# Altium PCB Layout.PcbDoc
Units mm, origin at the board's own origin, x right, y up, seen from the top; angles counter-clockwise.
Board outline 60 x 50 mm, 4 copper layers (Top Layer, Ground Layer, Power Layer, Bottom Layer), stack 1.591 mm thick; 80 components, 60 nets, 288 pads, 83 vias.
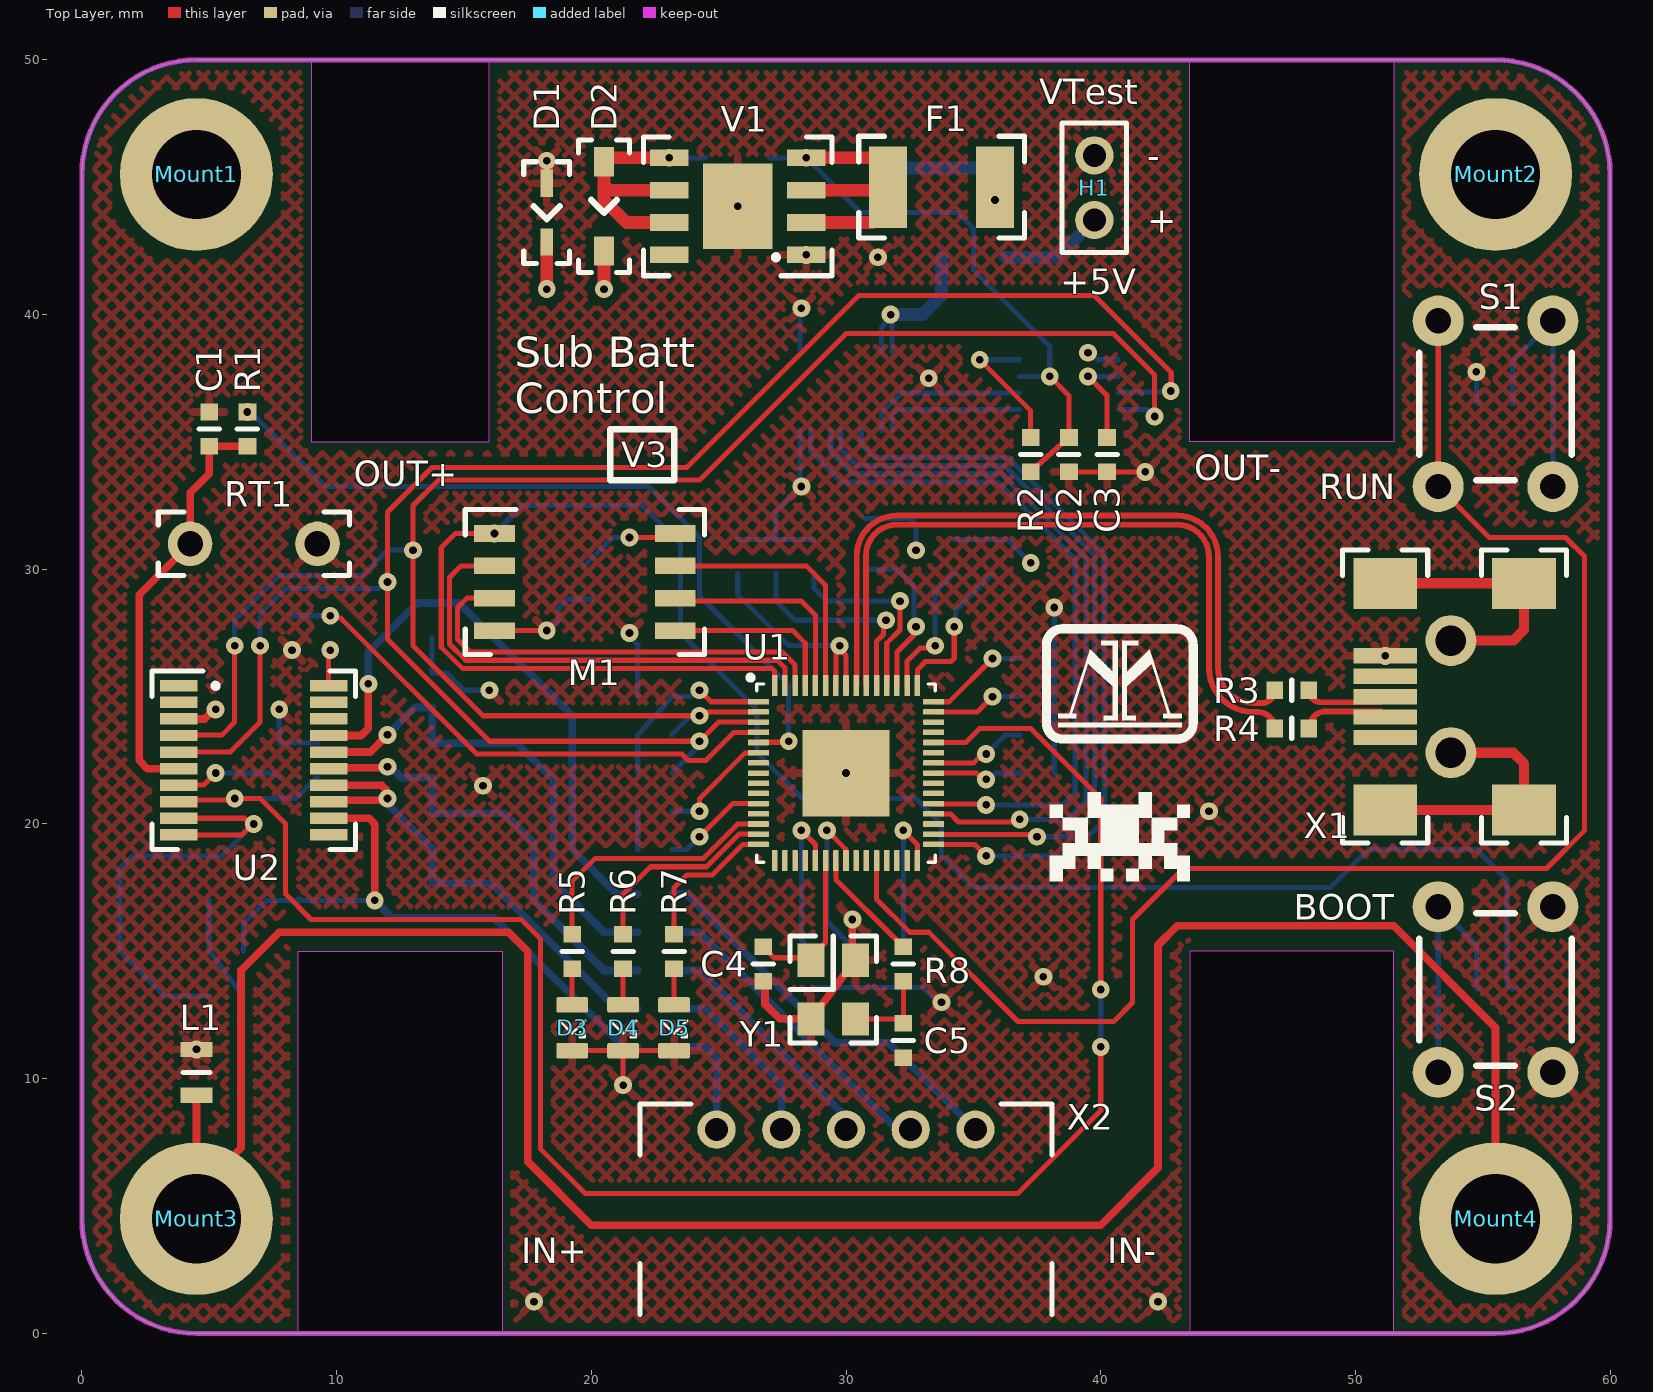
[diagram p0: Top Layer view]
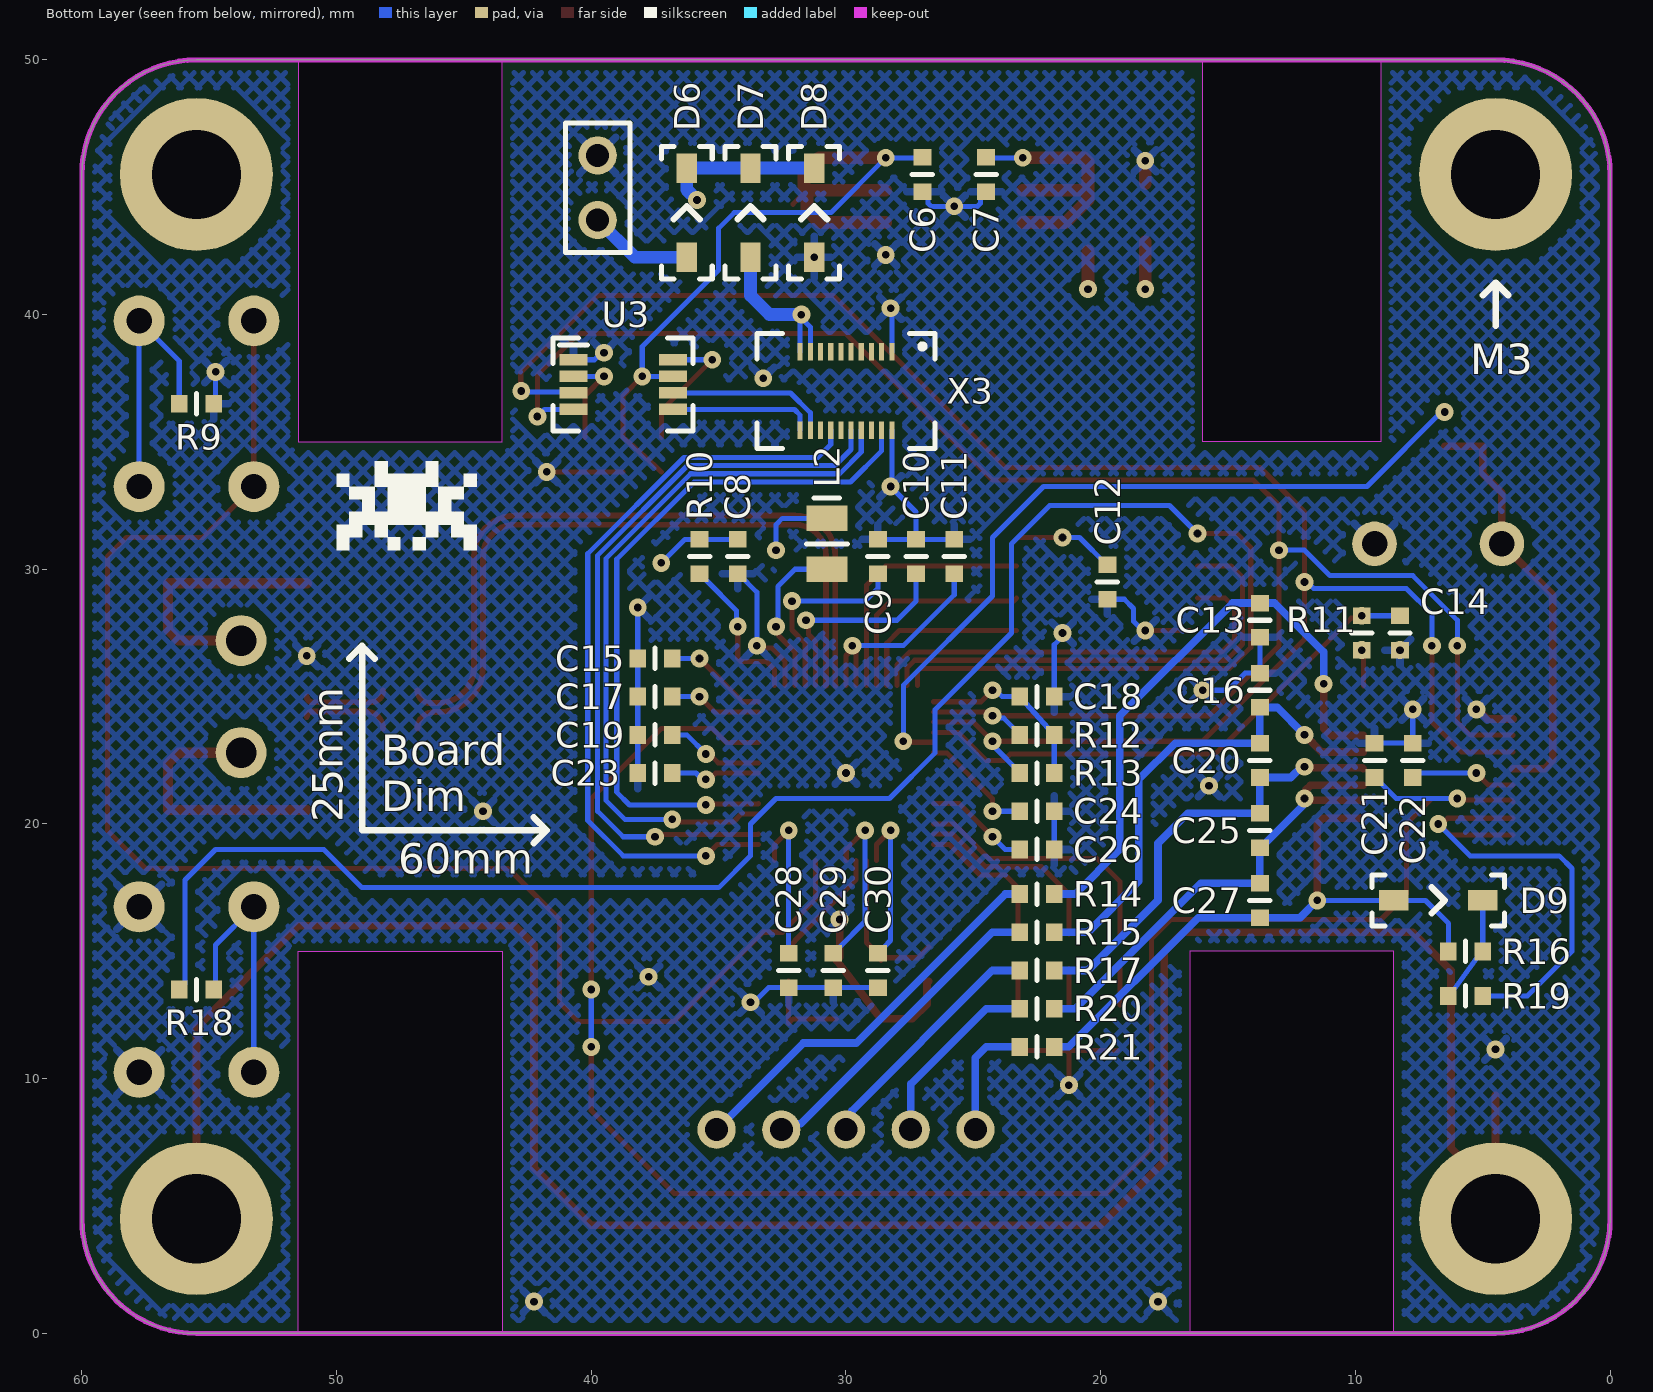
[diagram p1: Bottom Layer view, seen from below]
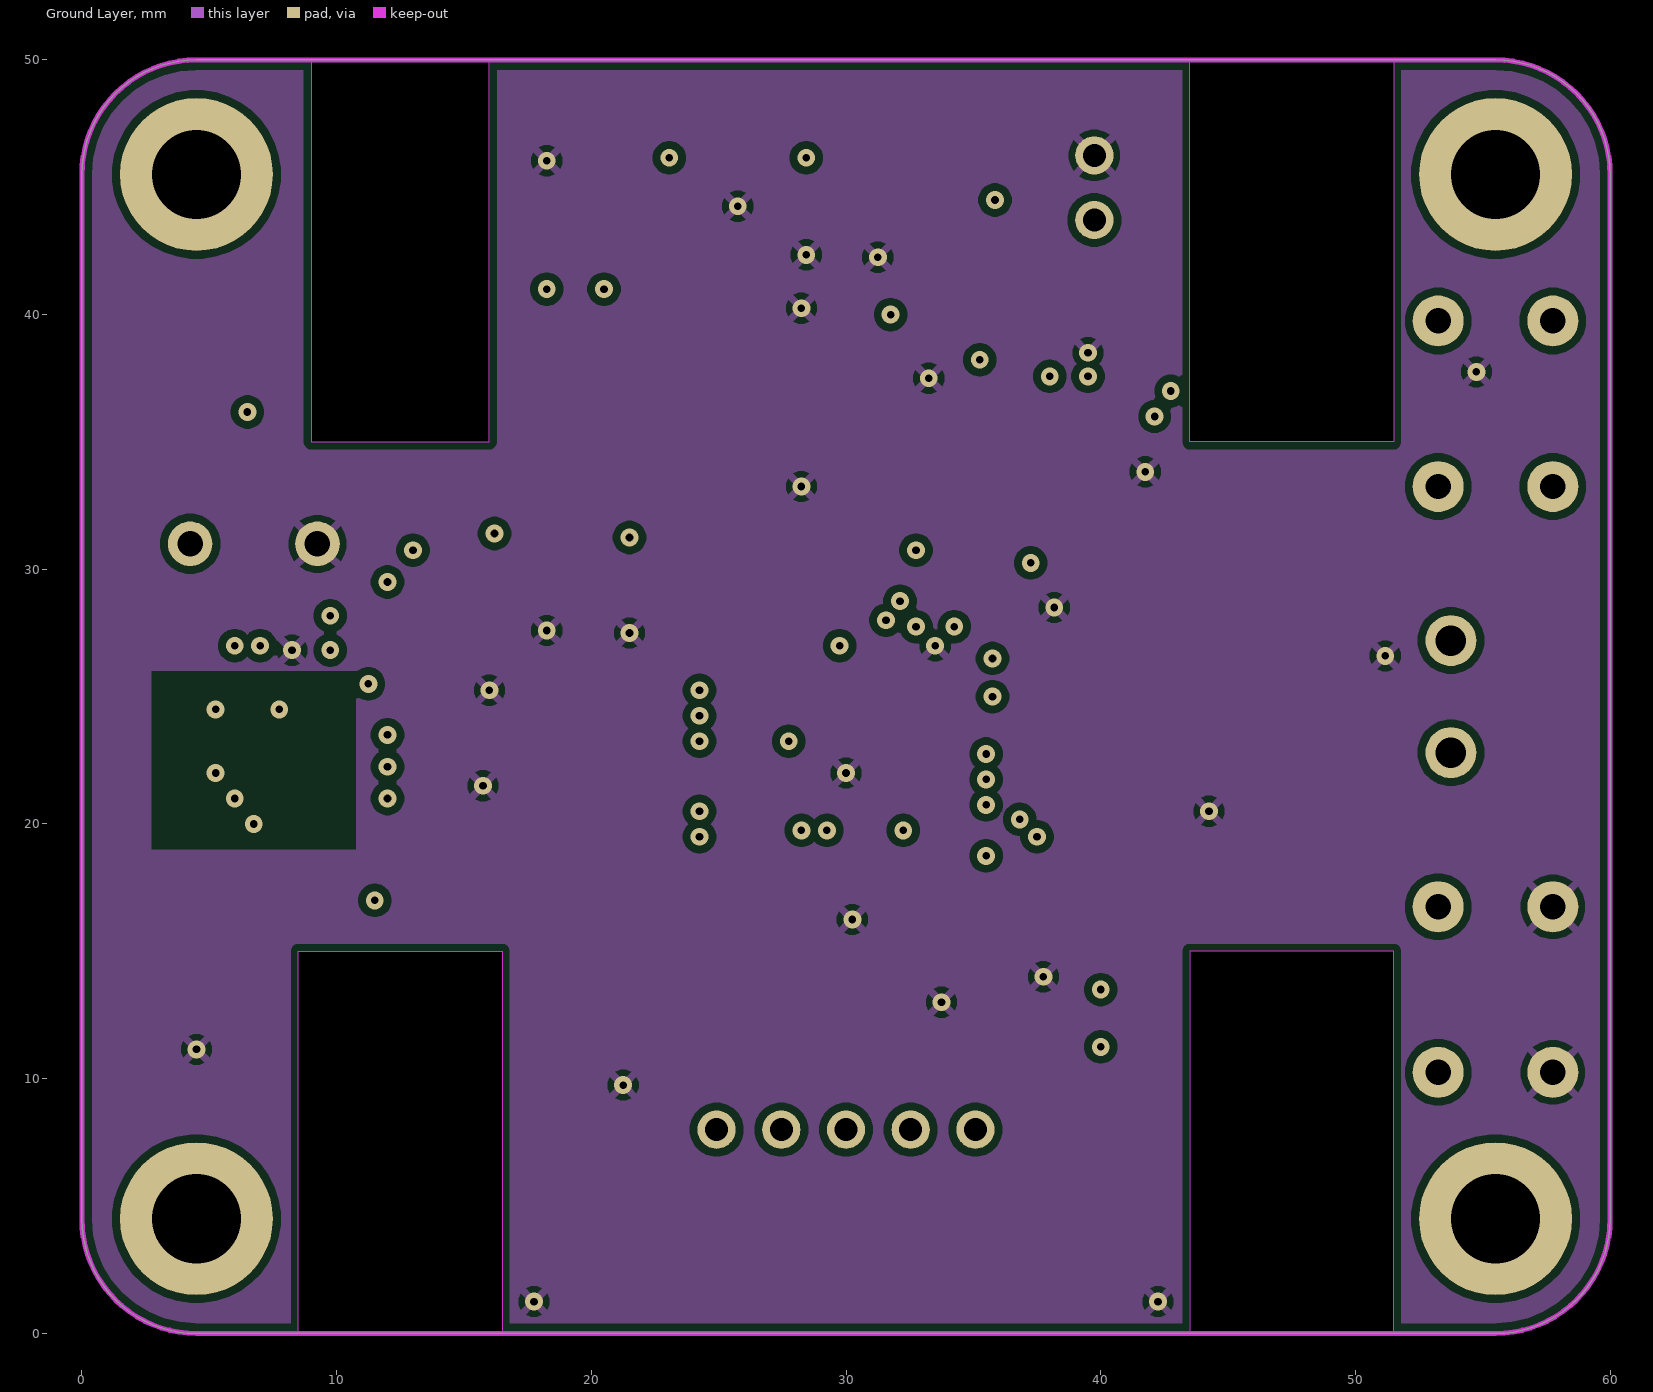
[diagram p2: Ground Layer]
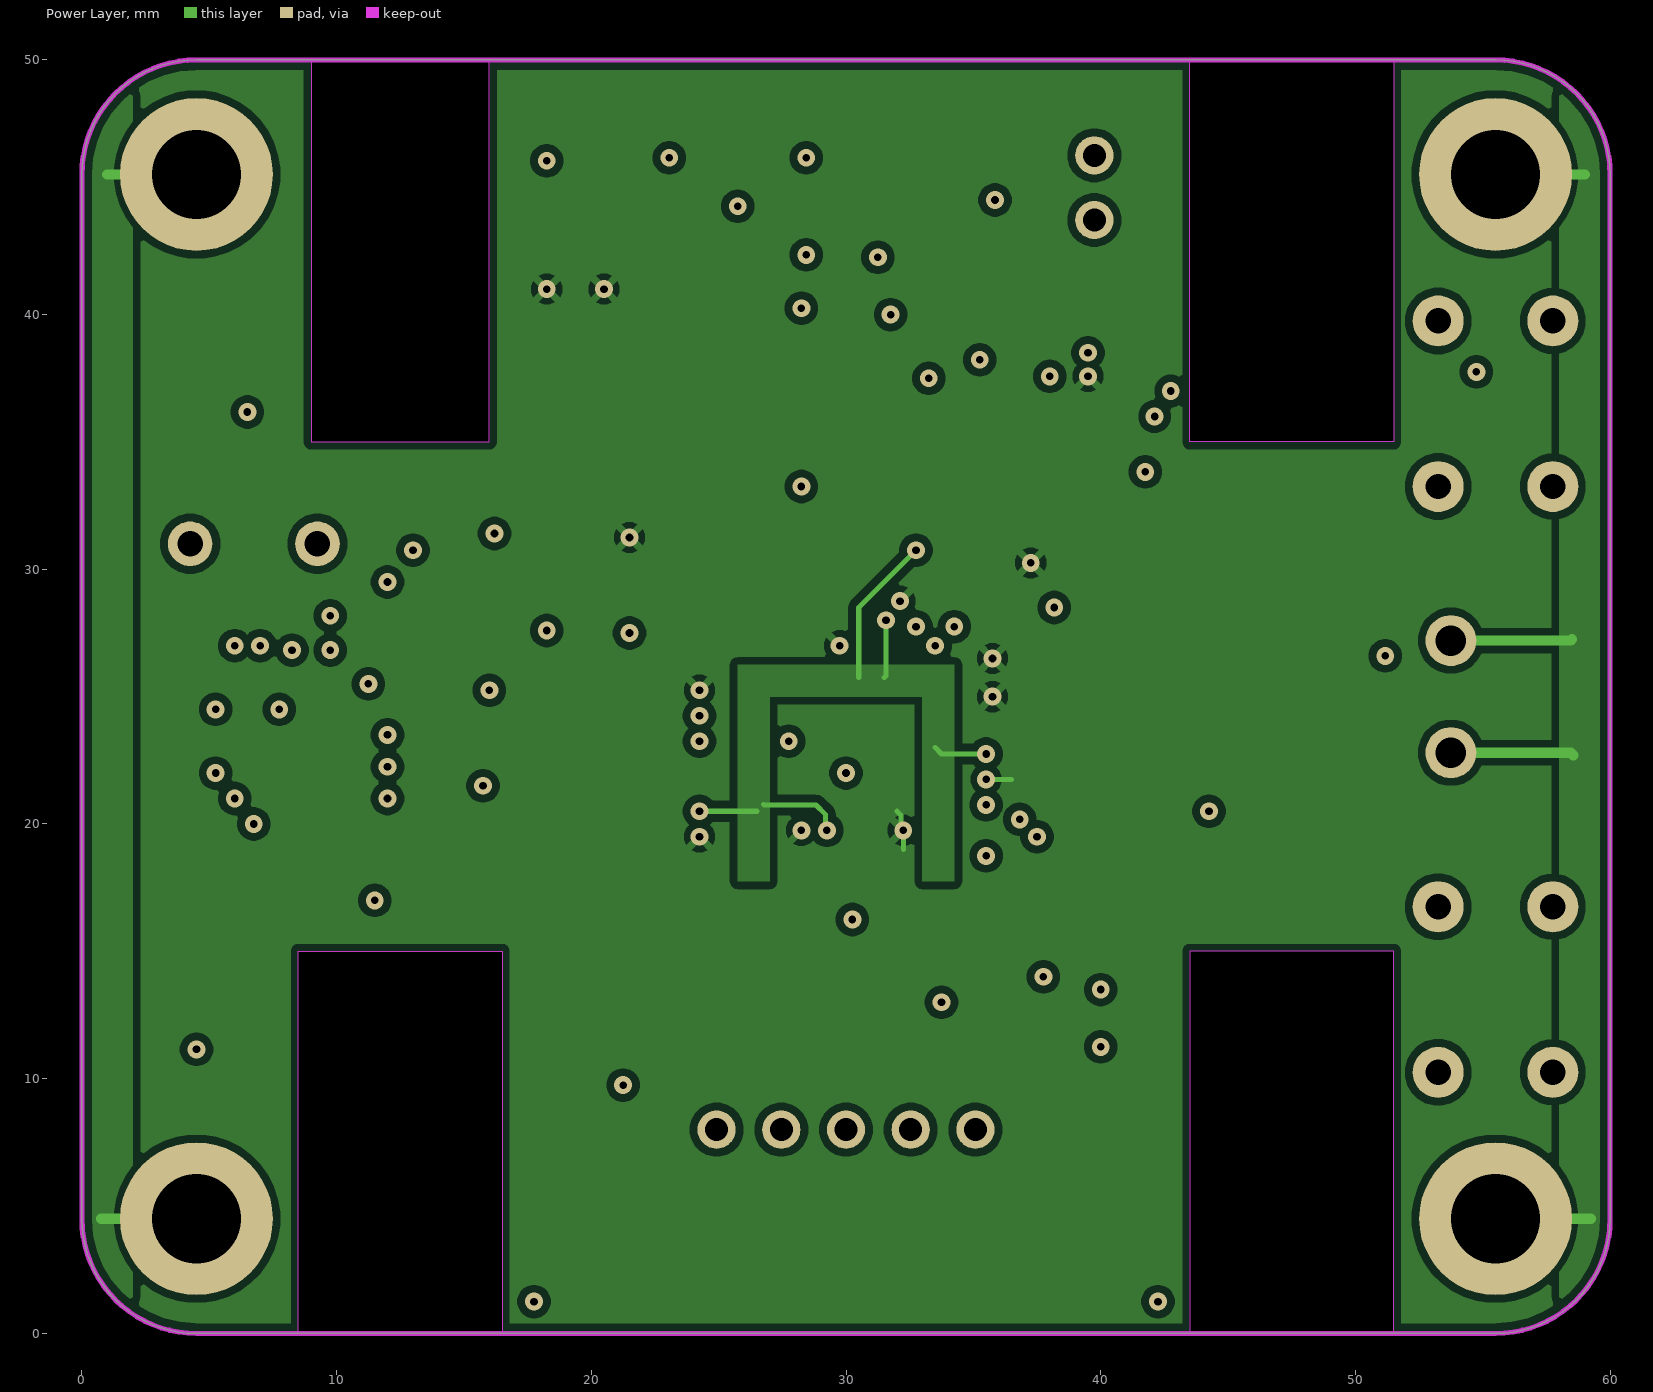
[diagram p3: Power Layer]

## Layer stack, top to bottom
Top Solder: solder mask 0.0102, Solder Resist, Dk 3.8
Top Layer: signal copper 0.035
Dielectric 2: prepreg 0.2104, 7628*1, Dk 4.4
Ground Layer: signal copper 0.0175
Dielectric 1: dielectric 1.065, FR-4, Dk 4.8
Power Layer: signal copper 0.0175
Dielectric 3: prepreg 0.2104, 7628*1, Dk 4.4
Bottom Layer: signal copper 0.035
Bottom Solder: solder mask 0.0102, Solder Resist, Dk 3.8

## Board outline
0,4.5 0,45.5 cw(c4.5,45.5) 4.5,50 55.5,50 cw(c55.5,45.5) 60,45.5 60,4.5 cw(c55.5,4.5) 55.5,0 4.5,0 cw(c4.5,4.5)
cut-out: 8.5,0 8.5,15 16.5,15 16.5,0
cut-out: 51.5,50 51.5,35 43.5,35 43.5,50
cut-out: 9,50 9,35 16,35 16,50
cut-out: 51.5,0 51.5,15 43.5,15 43.5,0

## Design rules (kind name [scope] priority, off if disabled: settings)
BoardOutlineClearance [All] p1: gap=0.2 ignorepadtopadclearanceinfootprint=FALSE
Clearance "inPolygon Clearance" [InPolygon] p1: gap=0.3 ignorepadtopadclearanceinfootprint=TRUE // this rule ensures that every net within a polygon of a different net has a set clearance from the poly
Clearance "Different Diff Pair" [All] p2: gap=0.2 ignorepadtopadclearanceinfootprint=TRUE
Clearance "Same Diff Pair" [All] p3: gap=0.1 ignorepadtopadclearanceinfootprint=TRUE
Clearance "Different Nets" [not InAnyDifferentialPair] p4: gap=0.3 ignorepadtopadclearanceinfootprint=TRUE except(0.1: Arc-SMDPad Arc-THPad Arc-Via Arc-Text Track-SMDPad Track-THPad Track-Via Track-Text SMDPad-Text THPad-Text Via-Text Fill-Text Poly-Text Region-Text Text-Text; 0.12: Arc-Arc Arc-Track Track-Track; 0.15: SMDPad-SMDPad SMDPad-THPad SMDPad-Via THPad-THPad THPad-Via Via-Via; 0.2: Arc-Hole Track-Hole SMDPad-Hole THPad-Hole Via-Hole Fill-Hole Poly-Hole Region-Hole Text-Hole)
Clearance "Same Net" [not InAnyDifferentialPair] p5: gap=0 ignorepadtopadclearanceinfootprint=TRUE except(0.1: THPad-Via; 0.18: Arc-Arc Arc-Track Track-Track)
ComponentClearance [All] p1: gap=0.102 collisioncheckmode=3 verticalgap=0.102 showdistances=TRUE
DiffPairsRouting "Ethernet Routing" [InDifferentialPairClass('Ethernet_Pairs')] p1: maxlimit=0.25 minlimit=0.2 mostfreqgap=0.25 toplayer_maxgap=0.2 toplayer_prefgap=0.2 toplayer_minwidth=0.25 toplayer_maxwidth=0.25 toplayer_prefwidth=0.25 midlayer1_mingap=0.25 midlayer1_minwidth=0.19 midlayer1_maxwidth=0.19 midlayer1_prefwidth=0.19 midlayer2_mingap=0.25 midlayer2_minwidth=0.19 midlayer2_maxwidth=0.19 midlayer2_prefwidth=0.19 bottomlayer_maxgap=0.2 bottomlayer_prefgap=0.2 bottomlayer_minwidth=0.25 bottomlayer_maxwidth=0.25 bottomlayer_prefwidth=0.25 impedanceprofiledriven=TRUE maxuncoupledlength=12.7
DiffPairsRouting "USB Routing" [InDifferentialPairClass('USB_Pairs')] p2: maxlimit=0.291 minlimit=0.127 mostfreqgap=0.291 toplayer_maxgap=0.127 toplayer_prefgap=0.127 toplayer_minwidth=0.23 toplayer_maxwidth=0.23 toplayer_prefwidth=0.23 midlayer1_mingap=0.291 midlayer1_minwidth=0.25 midlayer1_maxwidth=0.25 midlayer1_prefwidth=0.25 midlayer2_mingap=0.291 midlayer2_minwidth=0.25 midlayer2_maxwidth=0.25 midlayer2_prefwidth=0.25 bottomlayer_maxgap=0.127 bottomlayer_prefgap=0.127 bottomlayer_minwidth=0.23 bottomlayer_maxwidth=0.23 bottomlayer_prefwidth=0.23 impedanceprofiledriven=TRUE impedanceprofileid={C9F4D3A4-5B07-450B-A906-2288EA58A68B} impedanceprofilevalue=90.000000 maxuncoupledlength=12.7
DiffPairsRouting "CAN Routing" [InDifferentialPairClass('CAN_Pairs')] p3: maxlimit=0.907 minlimit=0.5 mostfreqgap=0.907 toplayer_maxgap=0.5 toplayer_prefgap=0.5 toplayer_minwidth=0.201 toplayer_maxwidth=0.201 toplayer_prefwidth=0.201 midlayer1_mingap=0.907 midlayer1_minwidth=0.155 midlayer1_maxwidth=0.155 midlayer1_prefwidth=0.155 midlayer2_mingap=0.907 midlayer2_minwidth=0.155 midlayer2_maxwidth=0.155 midlayer2_prefwidth=0.155 bottomlayer_maxgap=0.5 bottomlayer_prefgap=0.5 bottomlayer_minwidth=0.201 bottomlayer_maxwidth=0.201 bottomlayer_prefwidth=0.201 impedanceprofiledriven=TRUE maxuncoupledlength=12.7
Height [All] p1: minheight=0 maxheight=1816.048 prefheight=12.7
HoleSize [All] p1: absolutevalues=TRUE maxlimit=6.3 minlimit=0.3 maxpercent=80.000 minpercent=20.000
HoleToHoleClearance [All] p1: gap=0.25 allowstackedmicrovias=FALSE
MatchedLengths "XTAL Nets Matched Delays" [InNetClass('XTAL_Nets')] p1: tolerance=25.4 checknetsindiffpair=FALSE checkdiffpairvsdiffpair=TRUE checkxsignals=TRUE checkothers=TRUE usedelayunits=TRUE delaytolerance=10.000000
MatchedLengths "Diff Pair Matched Delays" [InDifferentialPairClass('Ethernet_Pairs') or InDifferentialPairClass('USB_Pairs') or InDifferentialPairClass('CAN_Pairs')] p2: tolerance=5 checknetsindiffpair=TRUE checkdiffpairvsdiffpair=FALSE checkxsignals=FALSE checkothers=FALSE usedelayunits=TRUE delaytolerance=100.000000 phasematching=TRUE phasedelaytolerance=5.000000 phasedistance=12.7
MinimumAnnularRing [All] p1: minimumring=0.2
MinimumSolderMaskSliver [All] p1: minsoldermaskwidth=0
PlaneClearance "Supply Net Clearance" [InNetClass('Supply_Nets')] p1: clearance=0.5
PlaneClearance "All Nets" [All] p2: clearance=0.3
PlaneConnect [All] p1: planeconnectstyle=Relief reliefexpansion=0.5 reliefentries=4 reliefconductorwidth=0.2 reliefairgap=0.2
PolygonConnect "Supply Nets" [InNetClass('Supply_Nets')] p1: connectstyle=Relief reliefconductorwidth=0.3 reliefentries=4 polygonreliefangle="90 Angle" conductorbypadedge=TRUE mindistance=0.381 enablemindistance=FALSE airgapwidth=0.254
PolygonConnect General [All] p2: connectstyle=Relief reliefconductorwidth=0.254 reliefentries=4 polygonreliefangle="90 Angle" airgapwidth=0.254
RoutingVias [All] p1: holewidth=0.2 width=0.35 viastyle="Through Hole" minholewidth=0.15 minwidth=0.3 maxholewidth=6.3 maxwidth=6.55
SilkToSilkClearance [All] p1: silktosilkclearance=0
SilkToSolderMaskClearance [All] p1: minsilkscreentomaskgap=0 clearancetoexposedcopper=TRUE
SolderMaskExpansion [All] p1: expansion=0.075 istentingtop=FALSE
SupplyNets "Schematic Supply Nets_7" [InNet('+1V1')] p1: voltage=0.000
SupplyNets "Schematic Supply Nets_6" [InNet('+3V3')] p2: voltage=0.000
SupplyNets "Schematic Supply Nets_5" [InNet('XOUT')] p3: voltage=0.000
SupplyNets "Schematic Supply Nets_4" [InNet('+5V')] p4: voltage=0.000
SupplyNets "Schematic Supply Nets_2" [InNet('XIN')] p5: voltage=0.000
SupplyNets "Schematic Supply Nets" [InNet('RUN')] p6: voltage=0.000
SupplyNets "Schematic Supply Nets_3" [InNet('GND')] p7: voltage=0.000
SupplyNets "Schematic Supply Nets_1" [InNet('Earth')] p8: voltage=0.000
UnRoutedNet [All] p1: checkbadconnections=TRUE
Width "nRF Width" [InNetClass('nRF Signal')] p1: maxlimit=0.379 minlimit=0.263 preferedwidth=0.379 toplayer_minwidth=0.379 midlayer1_maxwidth=0.263 midlayer1_prefwidth=0.263 midlayer2_maxwidth=0.263 midlayer2_prefwidth=0.263 bottomlayer_minwidth=0.379 impedanceprofiledriven=TRUE minimp=50.000000 maximp=50.000000 favimp=50.000000 checkconnectedcopper=TRUE
Width [All] p2: maxlimit=100 minlimit=0.1 preferedwidth=0.2
19 further rules are at their usual default settings.

## Classes and differential pairs
net class XTAL_Nets: XIN XOUT
component class "Battery Monitor": C1 C13 C14 C16 C20 C21 C22 C25 C27 D9 R1 R11 R14 R15 R16 R17 R19 R20 R21 RT1 U2
differential pair class USB_Pairs: RP2350_D RP2350_DX
net class Supply_Nets: +3V3 +5V +5V_Test_Src +5V_VIN Earth GND NetC7_2 NetD6_1
component class RP2350: C2 C3 C4 C5 C8 C9 C10 C11 C12 C15 C17 C18 C19 C23 C24 C26 C28 C29 C30 D3 D4 D5 L2 M1 R2 R3 R4 R5 R6 R7 R8 R9 R10 R12 R13 R18 S1 S2 U1 U3 X1 Y1
component class Power: C6 C7 D1 D2 D6 D7 D8 F1 H1 q V1
component class Connections: L1 Mount1 Mount2 Mount3 Mount4 X2 X3
differential pair RP2350_DX: +RP2350_DX_P -RP2350_DX_N
differential pair RP2350_D: +RP2350_D_P -RP2350_D_N

## Components (designator, comment, footprint, x,y, rotation, side; value= is the part's Value field where it differs from the comment)
C1 "[Cap] 0603 4700pF 5% 50V" "[Cap] SMD 0603" 5,35.5 r270 top (schematic designator C24)
C2 "[Cap] 0603 0.1uF 10% 50V" "[Cap] SMD 0603" 38.75,34.5 r90 top (schematic designator C1)
C3 "[Cap] 0603 0.1uF 10% 50V" "[Cap] SMD 0603" 40.25,34.5 r90 top (schematic designator C2)
C4 "[Cap] 0603 15pF 1% 100V" "[Cap] SMD 0603" 26.75,14.5 r90 top (schematic designator C8)
C5 "[Cap] 0603 15pF 1% 100V" "[Cap] SMD 0603" 32.25,11.5 r90 top (schematic designator C10)
C6 "[Cap] 0603 10uF 10% 10V" "[Cap] SMD 0603" 27,45.5 r90 bottom (schematic designator C11)
C7 "[Cap] 0603 10uF 10% 10V" "[Cap] SMD 0603" 24.5,45.5 r90 bottom (schematic designator C12)
C8 "[Cap] 0603 4.7uF 10% 25V" "[Cap] SMD 0603" 34.25,30.5 r90 bottom (schematic designator C13)
C9 "[Cap] 0603 4.7uF 10% 25V" "[Cap] SMD 0603" 28.75,30.5 r90 bottom (schematic designator C14)
C10 "[Cap] 0603 4.7uF 10% 25V" "[Cap] SMD 0603" 27.25,30.5 r90 bottom (schematic designator C15)
C11 "[Cap] 0603 0.1uF 10% 50V" "[Cap] SMD 0603" 25.75,30.5 r270 bottom (schematic designator C16)
C12 "[Cap] 0603 0.1uF 10% 50V" "[Cap] SMD 0603" 19.738,29.5 r90 bottom (schematic designator C17)
C13 "[Cap] 0603 1uF 10% 25V" "[Cap] SMD 0603" 13.75,28 r270 bottom (schematic designator C27)
C14 "[Cap] 0603 470pF 5% 50V" "[Cap] SMD 0603" 8.25,27.5 r90 bottom (schematic designator C6)
C15 "[Cap] 0603 0.1uF 10% 50V" "[Cap] SMD 0603" 37.5,26.5 r180 bottom (schematic designator C18)
C16 "[Cap] 0603 1uF 10% 25V" "[Cap] SMD 0603" 13.75,25.25 r270 bottom (schematic designator C26)
C17 "[Cap] 0603 0.1uF 10% 50V" "[Cap] SMD 0603" 37.5,25 r180 bottom (schematic designator C19)
C18 "[Cap] 0603 0.1uF 10% 50V" "[Cap] SMD 0603" 22.5,25 r0 bottom (schematic designator C20)
C19 "[Cap] 0603 4.7uF 10% 25V" "[Cap] SMD 0603" 37.5,23.5 r180 bottom (schematic designator C21)
C20 "[Cap] 0603 1uF 10% 25V" "[Cap] SMD 0603" 13.75,22.5 r270 bottom (schematic designator C9)
C21 "[Cap] 0603 4.7uF 10% 25V" "[Cap] SMD 0603" 9.25,22.5 r270 bottom (schematic designator C4)
C22 "[Cap] 0603 1uF 10% 50V" "[Cap] SMD 0603" 7.75,22.5 r270 bottom (schematic designator C5)
C23 "[Cap] 0603 0.1uF 10% 50V" "[Cap] SMD 0603" 37.5,22 r180 bottom (schematic designator C22)
C24 "[Cap] 0603 0.1uF 10% 50V" "[Cap] SMD 0603" 22.5,20.5 r0 bottom (schematic designator C23)
C25 "[Cap] 0603 1uF 10% 25V" "[Cap] SMD 0603" 13.75,19.75 r270 bottom (schematic designator C7)
C26 "[Cap] 0603 0.1uF 10% 50V" "[Cap] SMD 0603" 22.5,19 r0 bottom (schematic designator C25)
C27 "[Cap] 0603 1uF 10% 25V" "[Cap] SMD 0603" 13.75,17 r270 bottom (schematic designator C3)
C28 "[Cap] 0603 0.1uF 10% 50V" "[Cap] SMD 0603" 32.25,14.25 r90 bottom
C29 "[Cap] 0603 0.1uF 10% 50V" "[Cap] SMD 0603" 30.5,14.25 r90 bottom
C30 "[Cap] 0603 0.1uF 10% 50V" "[Cap] SMD 0603" 28.75,14.25 r90 bottom
D1 "SOD-323" "[Diode] SOD-323" 18.25,44 r270 top
D2 "SOD123" "[Diode] SMD SOD-123" 20.5,44.25 r270 top
D3 "[LED] SMD 0805 Green" "[LED] SMD 0805" 19.25,12 r270 top (schematic designator D5)
D4 "[LED] SMD 0805 Yellow" "[LED] SMD 0805" 21.25,12 r270 top (schematic designator D3)
D5 "[LED] SMD 0805 Red" "[LED] SMD 0805" 23.25,12 r270 top (schematic designator D4)
D6 "SOD123" "[Diode] SMD SOD-123" 36.25,44 r90 bottom
D7 "SOD123" "[Diode] SMD SOD-123" 33.75,44 r90 bottom
D8 "SOD-123" "[Diode] SMD SOD-123" 31.25,44 r90 bottom
D9 "SOD123" "[Diode] SMD SOD-123" 6.75,17 r180 bottom
F1 "[PTC] SMD 1812 500mA" "[PTC] SMD 1812" 33.75,45 r180 top
H1 "1x2 Header" "[Header] 1x2 Male" 39.75,44.98 r90 top
L1 "652-MH2029-300Y" "[Ferrite] SMD 0805" 4.5,10.25 r90 top
L2 "[3.3uH] SMD 0806 2.1A" "[Inductor] SMD 0806" 30.75,31 r270 bottom
M1 "W25Q128JVSIM" "[Flash] 128MBit" 19.75,29.5 r0 top
Mount1 "M3 Mount Hole" "[Mount] M3 Mount Hole" 4.5,45.5 r0 top
Mount2 "M3 Mount Hole" "[Mount] M3 Mount Hole" 55.5,45.5 r0 top
Mount3 "M3 Mount Hole" "[Mount] M3 Mount Hole" 4.5,4.5 r0 top
Mount4 "M3 Mount Hole" "[Mount] M3 Mount Hole" 55.5,4.5 r0 top
R1 "[3.3k] SMD 0603 1% 1/10W" "[Res] SMD 0603" 6.5,35.5 r270 top (schematic designator R17)
R2 "[200k] SMD 0603 1% 1/10W" "[Res] SMD 0603" 37.25,34.5 r270 top (schematic designator R1)
R3 "[27] SMD 0603 1% 1/10W" "[Res] SMD 0603" 47.5,25.25 r180 top (schematic designator R7)
R4 "[27] SMD 0603 1% 1/10W" "[Res] SMD 0603" 47.5,23.75 r180 top (schematic designator R8)
R5 "[220] SMD 0603 5% 1/10W" "[Res] SMD 0603" 19.25,15 r90 top (schematic designator R12)
R6 "[220] SMD 0603 5% 1/10W" "[Res] SMD 0603" 21.25,15 r90 top (schematic designator R13)
R7 "[220] SMD 0603 5% 1/10W" "[Res] SMD 0603" 23.25,15 r90 top (schematic designator R14)
R8 "[1k] SMD 0603 1% 1/10W" "[Res] SMD 0603" 32.25,14.5 r90 top (schematic designator R10)
R9 "[1k] SMD 0603 1% 1/10W" "[Res] SMD 0603" 55.5,36.5 r0 bottom (schematic designator R15)
R10 "[33] SMD 0603 0.5% 1/16W" "[Res] SMD 0603" 35.75,30.5 r270 bottom (schematic designator R16)
R11 "[499k] SMD 0603 1% 1/8W" "[Res] SMD 0603" 9.75,27.5 r90 bottom (schematic designator R5)
R12 "[1k] SMD 0603 1% 1/10W" "[Res] SMD 0603" 22.5,23.5 r180 bottom (schematic designator R18)
R13 "[1k] SMD 0603 1% 1/10W" "[Res] SMD 0603" 22.5,22 r180 bottom (schematic designator R20)
R14 "[100] SMD 0603 1% 1/10W" "[Res] SMD 0603" 22.5,17.25 r180 bottom (schematic designator R19)
R15 "[100] SMD 0603 1% 1/10W" "[Res] SMD 0603" 22.5,15.75 r180 bottom (schematic designator R11)
R16 "[10k] SMD 0603 1% 1/8W" "[Res] SMD 0603" 5.675,15 r0 bottom (schematic designator R2)
R17 "[100] SMD 0603 1% 1/10W" "[Res] SMD 0603" 22.5,14.25 r180 bottom (schematic designator R9)
R18 "[1k] SMD 0603 1% 1/10W" "[Res] SMD 0603" 55.5,13.5 r180 bottom (schematic designator R21)
R19 "[100] SMD 0603 1% 1/10W" "[Res] SMD 0603" 5.675,13.25 r180 bottom (schematic designator R3)
R20 "[100] SMD 0603 1% 1/10W" "[Res] SMD 0603" 22.5,12.75 r180 bottom (schematic designator R6)
R21 "[100] SMD 0603 1% 1/10W" "[Res] SMD 0603" 22.5,11.25 r180 bottom (schematic designator R4)
RT1 "[NTC] 10k Thru-Hole 5mm Pitch" "[NTC] 10k Thru-Hole 5mm Pitch" 6.75,31 r180 top
S1 "Standard pushbutton" "[SPST] Pushbutton" 55.5,36.5 r90 top
S2 "Standard pushbutton" "[SPST] Pushbutton" 55.5,13.5 r90 top
U1 "RP2350A" "[MCU] RP2350A" 30,22 r0 top
U2 "[Batt Mon] 3-5 Cell BMS" "[Batt Mon] 3-5 Cell BMS" 6.75,22.5 r0 top
U3 "[Level Shifter] I2C Level Shifter" "[Level Shifter] I2C Level Shifter" 38.75,37.25 r180 bottom
V1 "3V3 1.5A" "[Linear] 3V3 1.5A" 25.75,44.25 r180 top
X1 "[USB] Type-B Mini" "[USB] Type-B Mini" 55,25 r90 top
X2 "[JST] 5pin 90deg 2.54mm pitch" "[JST] 5pin 90deg 2.54mm pitch" 30,8 r270 top (schematic designator X3)
X3 "[Mezzanine] 20pin H=3.5mm Male" "[Mezzanine] 20pin H=3.5mm Male" 30,37 r0 bottom (schematic designator X2)
Y1 "XTAL 12MHz" "[Crystal] SMD 12MHz" 29.5,13.5 r270 top

## Footprints (in the part's own frame and the unit in brackets; to place one, negate y for a bottom-side part, rotate by r counter-clockwise, add the part's x,y. Pads: shape width x height; smd on the part's side, far side on the other; paste and mask are expansions set on the pad)
"[Batt Mon] 3-5 Cell BMS" [mm]
  rect 1.475x0.45 smd: 1(-2.938,2.925) 2(-2.938,2.275) 3(-2.938,1.625) 4(-2.938,0.975) 5(-2.938,0.325) 6(-2.938,-0.325) 7(-2.938,-0.975) 8(-2.938,-1.625) 9(-2.938,-2.275) 10(-2.938,-2.925) 11(2.938,-2.925) 12(2.938,-2.275) 13(2.938,-1.625) 14(2.938,-0.975) 15(2.938,-0.325) 16(2.938,0.325) 17(2.938,0.975) 18(2.938,1.625) 19(2.938,2.275) 20(2.938,2.925)
  silkscreen extent -4,-3.5 4,3.5, body extent -3.2,-3.25 3.2,3.25, height 1.13
"[Cap] SMD 0603" [mm]
  rect 0.65x0.7 smd: 1(-0.675,0) 2(0.675,0)
  silkscreen extent 0,-0.4 0,0.4, body extent -0.8,-0.45 0.8,0.45, height 0.8
"[Crystal] SMD 12MHz" [mm]
  rect 1.3x1.05 smd: 1(-1.15,-0.875) 2(1.15,-0.875) 3(1.15,0.875) 4(-1.15,0.875)
  silkscreen extent -2.1,-1.7 2.1,1.7, body extent -1.6,-1.25 1.6,1.25, height 0.75
"[Diode] SMD SOD-123" [mm]
  rect 1.15x0.8 smd: 1(1.75,0) 2(-1.75,0)
  silkscreen extent -2.6,-1 2.6,1, body extent -1.85,-0.8 1.86,0.8, height 1.35
"[Diode] SOD-323" [mm]
  rect 1.075x0.5 smd: 1(1.15,0) 2(-1.15,0)
  silkscreen extent -2,-0.9 2,0.9, body extent -1.27,-0.65 1.27,0.65, height 1.14
"[Ferrite] SMD 0805" [mm]
  rect 0.6x1.25 smd: 1(-0.9,0) 2(0.9,0)
  silkscreen extent 0,-0.53 0,0.53, body extent -1,-0.6 1,0.6, height 1.1
"[Flash] 128MBit" [mm] "W25Q128JVSIM"
  rect 1.6x0.65 smd: 1(-3.55,1.905) 2(-3.55,0.635) 3(-3.55,-0.635) 4(-3.55,-1.905) 5(3.55,-1.905) 6(3.55,-0.635) 7(3.55,0.635) 8(3.55,1.905)
  silkscreen extent -4.7,-2.85 4.7,2.85, body extent -3.9,-2.61 3.9,2.62, height 1.95
"[Header] 1x2 Male" [mm]
  round 1.5 hole 0.9: 1(-1.27,0) 2(1.27,0)
  silkscreen extent -2.54,-1.27 2.54,1.27, body extent -2.54,-1.27 2.54,1.27, height 9.5
"[Inductor] SMD 0806" [mm]
  rect 1x1.6 smd: 1(-1,0) 2(1,0)
  silkscreen extent -1.8,-0.8 0,0.8, body extent -1,-0.8 1,0.8, height 1
"[JST] 5pin 90deg 2.54mm pitch" [mm]
  round 1.5 hole 0.9: 1(0,-5.08) 2(0,-2.54) 3(0,0) 4(0,2.54) 5(0,5.08)
  silkscreen extent -1,-8.08 7.25,8.08, body extent -0.46,-7.71 7,7.71, height 5.88
"[LED] SMD 0805" [mm]
  rrect20% 0.6x1.25 smd: 1(-0.9,0) 2(0.9,0)
  silkscreen extent -0.28,-0.51 0.37,0.51, body extent -1,-0.65 1,0.65, height 0.8
"[Level Shifter] I2C Level Shifter" [mm] "PCA9306DCTR"
  rect 1.1x0.45 smd: 1(-1.95,0.975) 2(-1.95,0.325) 3(-1.95,-0.325) 4(-1.95,-0.975) 5(1.95,-0.975) 6(1.95,-0.325) 7(1.95,0.325) 8(1.95,0.975)
  silkscreen extent -2.75,-1.83 2.75,1.83, body extent -2,-1.48 2,1.48, height 1.3
"[Linear] 3V3 1.5A" [mm]
  rect 1.525x0.65 smd: 1(-2.688,1.905) 2(-2.688,0.635) 3(-2.688,-0.635) 4(-2.688,-1.905) 5(2.688,-1.905) 6(2.688,-0.635) 7(2.688,0.635) 8(2.688,1.905)
  rect 2.71x3.35 smd: 9(0,0)
  silkscreen extent -3.7,-2.73 3.7,2.73, body extent -3,-2.45 3,2.45, height 1.5
"[MCU] RP2350A" [mm]
  rrect25% 0.83x0.22 smd: 1(-3.44,2.8) 2(-3.44,2.4) 3(-3.44,2) 4(-3.44,1.6) 5(-3.44,1.2) 6(-3.44,0.8) 7(-3.44,0.4) 8(-3.44,0) 9(-3.44,-0.4) 10(-3.44,-0.8) 11(-3.44,-1.2) 12(-3.44,-1.6) 13(-3.44,-2) 14(-3.44,-2.4) 15(-3.44,-2.8) 31(3.44,-2.8) 32(3.44,-2.4) 33(3.44,-2) 34(3.44,-1.6) 35(3.44,-1.2) 36(3.44,-0.8) 37(3.44,-0.4) 38(3.44,0) 39(3.44,0.4) 40(3.44,0.8) 41(3.44,1.2) 42(3.44,1.6) 43(3.44,2) 44(3.44,2.4) 45(3.44,2.8)
  rrect25% 0.22x0.83 smd: 16(-2.8,-3.44) 17(-2.4,-3.44) 18(-2,-3.44) 19(-1.6,-3.44) 20(-1.2,-3.44) 21(-0.8,-3.44) 22(-0.4,-3.44) 23(0,-3.44) 24(0.4,-3.44) 25(0.8,-3.44) 26(1.2,-3.44) 27(1.6,-3.44) 28(2,-3.44) 29(2.4,-3.44) 30(2.8,-3.44) 46(2.8,3.44) 47(2.4,3.44) 48(2,3.44) 49(1.6,3.44) 50(1.2,3.44) 51(0.8,3.44) 52(0.4,3.44) 53(0,3.44) 54(-0.4,3.44) 55(-0.8,3.44) 56(-1.2,3.44) 57(-1.6,3.44) 58(-2,3.44) 59(-2.4,3.44) 60(-2.8,3.44)
  rect 3.4x3.4 smd paste-4: 61(0,0)
  silkscreen extent -3.85,-3.5 3.5,3.85, body extent -3.55,-3.55 3.55,3.55, height 0.96
"[Mezzanine] 20pin H=3.5mm Male" [mm] "DF40HC(3.5)-20DS-0.4V(51)"
  rect 0.2x0.7 smd paste-0.016 mask+0.05: 1(-1.8,-1.54) 2(-1.8,1.54) 3(-1.4,-1.54) 4(-1.4,1.54) 5(-1,-1.54) 6(-1,1.54) 7(-0.6,-1.54) 8(-0.6,1.54) 9(-0.2,-1.54) 10(-0.2,1.54) 11(0.2,-1.54) 12(0.2,1.54) 13(0.6,-1.54) 14(0.6,1.54) 15(1,-1.54) 16(1,1.54) 17(1.4,-1.54) 18(1.4,1.54) 19(1.8,-1.54) 20(1.8,1.54)
  silkscreen extent -3.5,-2.25 3.5,2.25, body extent -3.3,-1.69 3.3,1.69, height 3.4
"[Mount] M3 Mount Hole" [mm]
  round 6 hole 3.5: 1(0,0)
"[NTC] 10k Thru-Hole 5mm Pitch" [mm] "B57164K0103J000"
  round 1.75 hole 1: 1(-2.5,0) 2(2.5,0)
  silkscreen extent -3.75,-1.25 3.75,1.25, body extent -2.8,-1 2.8,1, height 5.45
"[PTC] SMD 1812" [mm]
  rect 1.5x3.2 smd: 1(-2.1,0) 2(2.1,0)
  silkscreen extent -3.25,-2 3.25,2, body extent -2.27,-1.62 2.27,1.62, height 1.1
"[Res] SMD 0603" [mm]
  rect 0.65x0.7 smd: 1(-0.675,0) 2(0.675,0)
  silkscreen extent 0,-0.4 0,0.4, body extent -0.8,-0.45 0.8,0.45, height 0.8
"[SPST] Pushbutton" [mm] "(Regular pushbutton)"
  round 2 hole 1: 1(-3.25,2.25) 1(3.25,2.25) 2(-3.25,-2.25) 2(3.25,-2.25)
  silkscreen extent -3,-3 3,3, body extent -3.85,-3 3.85,3, height 4.95
"[USB] Type-B Mini" [mm] "MUSB-05-S-B-SM-A-K-TR"
  rect 0.6x2.5 smd: 1(-1.6,3.83) 2(-0.8,3.83) 3(0,3.83) 4(0.8,3.83) 5(1.6,3.83)
  rect 2x2.5 smd: MH(-4.45,-1.62) MH(-4.45,3.83) MH(4.45,-1.62) MH(4.45,3.83)
  round 2 hole 1.2: MH(-2.2,1.25) MH(2.2,1.25)
  silkscreen extent -5.75,-3.29 5.75,5.5, body extent -5,-4.57 5,4.93, height 4.12

## Part data
C1: "GRM1885C1H472JA01D", Capacitance=4700pF, Max Voltage=50V, Size Package=0603, Supplier Part Number 1=490-9669-6-ND, Tolerance=5%, Supplier 1=DigiKey
C2 C3 C11 C12 C15 C17 C18 C23 C24 C26 C28 C29 C30: "CL10B104KB8NNNC", Capacitance=100nF, Max Voltage=50V, Size Package=0603, Supplier Part Number 1=1276-1000-6-ND, Tolerance=10%, Supplier 1=DigiKey
C4 C5: "GCM1885C2A150FA16D", Capacitance=15pF, Max Voltage=100V, Size Package=0603, Supplier Part Number 1=490-16416-1-ND, Tolerance=1%, Supplier 1=DigiKey
C6 C7: "CL10A106KP8NNNC", Capacitance=10uF, Max Voltage=10V, Size Package=0603, Supplier Part Number 1=1276-1192-6-ND, Tolerance=10%, Supplier 1=DigiKey
C8 C9 C10 C19 C21: "GRM188R61E475KE11D", Capacitance=4.7uF, Max Voltage=25V, Size Package=0603, Supplier Part Number 1=490-7203-6-ND, Tolerance=10%, Supplier 1=DigiKey
C13 C16 C20 C25 C27: "CL10B105KA8NNNC", Capacitance=1uF, Max Voltage=25V, Size Package=0603, Supplier Part Number 1=1276-1184-1-ND, Tolerance=10%, Supplier 1=DigiKey
C14: "C0603C471J5GACTU", Capacitance=470pF, Max Voltage=50V, Size Package=0603, Supplier Part Number 1=399-C0603C471J5GACTUDKR-ND, Tolerance=5%, Supplier 1=DigiKey
C22: "UMK107AB7105KA-T", Capacitance=1uF, Max Voltage=50V, Size Package=0603, Supplier Part Number 1=587-3247-1-ND, Tolerance=10%, Supplier 1=DigiKey
D1: library part "[TVS] 3.3Vnom 19Vclamp_max", "CDSOD323-T03C", Optimal Zener Voltage=4V, Supplier Part Number 1=CDSOD323-T03CDKR-ND, Supplier 1=DigiKey, Wattage=350W
D2 D6 D7 D9: library part "[Schottky] SMD 40V 1A", "B5819W-TP", Supplier Part Number 1=B5819W-TPMSCT-ND, Supplier 1=DigiKey
D3: "LG R971-KN-1-0-20-R18", Color=Green, Size Package=0805, Supplier Part Number 1=475-LGR971-KN-1CT-ND, Supplier 1=DigiKey
D4: "LY R976-PS-36-0-20-R18", Color=Yellow, Size Package=0805, Supplier Part Number 1=475-LYR976-PS-36-0-20-R18CT-ND, Supplier 1=DigiKey
D5: "LS R976-NR-1-0-20-R18", Color=Red, Size Package=0805, Supplier Part Number 1=475-LSR976-NR-1CT-ND, Supplier 1=DigiKey
D8: library part "[Zener] SMD 5.6V 1/2W 5%", "CMHZ5232B TR PBFREE", Optimal Zener Voltage=5.6V, Supplier Part Number 1=1514-CMHZ5232BTRPBFREEDKR-ND, Tolerance=5%, Supplier 1=DigiKey, Wattage=500mW
F1: "MF-MSMF050-2", Size Package=1812, Supplier Part Number 1=MF-MSMF050-2DKR-ND, Trip Current=500mA, Supplier 1=DigiKey
H1: library part "[Header] 1x2 Male", "2.54mm pitch"
L1: library part "[Ferrite] SMD 0805 3A 30ohm", Res @ Freq="30 @ 100MHz", Size Package=0805, Supplier Part Number 1=MH2029-300YCT-ND, Supplier 1=DigiKey
L2: "AOTA-B201610S3R3-101-T", Inductance=3.3uH, Package=0806, Supplier Part Number 1=535-AOTA-B201610S3R3-101-TCT-ND, Supplier 1=DigiKey
M1: library part "[Flash] 128MBit", Supplier Part Number 1=W25Q128JVSIM-ND, Supplier 1=DigiKey
Mount1 Mount2 Mount3 Mount4: library part "[Mount] M3 Mount Hole", "Place at least 4.5mm from board edge. Plated."
R1: "RC0603FR-073K3L", Resistance=3.3k, Size Package=0603, Supplier Part Number 1=311-3.30KHRCT-ND, Tolerance=1%, Supplier 1=DigiKey, Wattage=1/10W
R2: "RC0603JR-07200KL", Resistance=200k, Size Package=0603, Supplier Part Number 1=311-200KGRCT-ND, Tolerance=5%, Supplier 1=DigiKey, Wattage=1/10W
R3 R4: "MCT06030C2709FP500", Resistance=27, Size Package=0603, Supplier Part Number 1=749-1631-1-ND, Tolerance=1%, Supplier 1=DigiKey, Wattage=1/10W
R5 R6 R7: "RK73B1JTTD221J", Resistance=220, Size Package=0603, Supplier Part Number 1=2019-RK73B1JTTD221JDKR-ND, Tolerance=5%, Supplier 1=DigiKey, Wattage=1/8W
R8 R9 R12 R13 R18: "RMCF0603FT1K00", Resistance=1k, Size Package=0603, Supplier Part Number 1=RMCF0603FT1K00DKR-ND, Tolerance=1%, Supplier 1=DigiKey, Wattage=1/10W
R10: "RR0816Q-330-D", Resistance=33, Size Package=0603, Supplier Part Number 1=RR08Q33DDKR-ND, Tolerance=0.5%, Supplier 1=DigiKey, Wattage=1/16W
R11: "CRCW0603499KFKEA", Resistance=499k, Size Package=0603, Supplier Part Number 1=541-499KHCT-ND, Tolerance=1%, Supplier 1=DigiKey, Wattage=1/8W
R14 R15 R17 R19 R20 R21: "RC0603FR-07100RL", Resistance=100, Size Package=0603, Supplier Part Number 1=311-100HRDKR-ND, Tolerance=1%, Supplier 1=DigiKey, Wattage=1/10W
R16: "RMCF0603FT10K0", Resistance=10k, Size Package=0603, Supplier Part Number 1=RMCF0603FT10K0DKR-ND, Tolerance=1%, Supplier 1=DigiKey, Wattage=1/10W
RT1: "B57164K0103J000", Supplier Part Number 1=495-2080-ND, Mounting Style=Thru-Hole, Res at 25degC=10k, Supplier 1=DigiKey, Technology=NTC
S1 S2: library part "[SPST] Pushbutton", Supplier Part Number 1=450-1650-ND, Supplier 1=DigiKey
U1: library part "[MCU] RP2350A", "QFN-60 Package", Supplier Part Number 1=2648-SC1509-A4CT-ND, Supplier 1=DigiKey
U2: "BQ7692006PWR", Supplier Part Number 1=296-39960-1-ND, Supplier 1=DigiKey
U3: "PCA9306DCTR", Supplier Part Number 1=296-18509-1-ND, Supplier 1=DigiKey
V1: library part "[Linear] 3V3 1.5A", "AP7362A-33SP-13", Supplier Part Number 1=AP7362A-33SP-13DICT-ND, Supplier 1=DigiKey
X1: "MUSB-05-S-B-SM-A-K-TR", Supplier Part Number 1=SAM14226CT-ND, Supplier 1=DigiKey
X3: "DF40HC(3.5)-20DS-0.4V(51)", Supplier Part Number 1=26-DF40HC(3.5)-20DS-0.4V(51)CT-ND, Supplier 1=DigiKey, System=Connector
Y1: library part "[Crystal] SMD 12MHz", "815-ABM8-272-T3", Supplier Part Number 1=535-ABM8-272-T3CT-ND, Supplier 1=DigiKey

## Via types
v1: diameter 0.7, hole 0.3, Top Layer to Bottom Layer, 83 vias

## Nets (pads, with @x,y where several pads share a name; then routed paths per layer and width w, separated by ;. In a path a pad name is that pad's centre, name@x,y a point inside that pad or via, vN(x,y) a via of type N, cw(c..) or ccw(c..) an arc to the next point about the centre after c; other vN are vias at no path point)
+1V1: C10.1 C19.2 C24.2 C29.2 L2.1 U1.6 U1.23 U1.39 U1.50 | length 42.7
  Top Layer w0.2: v1(24.25,20.5) 24.255,20.505 24.255,21.005 26.043,22.793 26.553,22.793 U1.6 ; v1(29.25,19.75) 29.99,19.01 29.99,18.57 U1.23 ; U1.50 31.2,27.17 31.474,27.444 31.474,27.904 v1(31.57,28) ; U1.39 35.015,22.4 35.365,22.75 v1(35.5,22.75)
  Power Layer w0.2: v1(24.25,20.5) 26.5,20.5 ; 26.769,20.769 26.787,20.75 28.82,20.75 29.19,20.38 29.19,19.81 v1(29.25,19.75) ; 30.5,25.75 30.5,28.5 v1(32.75,30.75) ; 31.5,25.75 31.57,25.82 v1(31.57,28) ; 33.5,23 33.75,22.75 v1(35.5,22.75)
  Bottom Layer w0.2: C24.2 v1(24.25,20.5) ; C10.1 27.25,28.75 28,28 v1(31.57,28) ; v1(29.25,19.75) 29.25,16.175 30.25,15.175 30.25,15.15 30.475,14.925 C29.2 ; L2.1 32.5,32 32.75,31.75 v1(32.75,30.75) ; v1(35.5,22.75) 36.25,23.5 C19.2
+3V3: C3.2 C8.2 C9.1 C11.2 C12.2 C15.2 C17.2 C18.2 C23.2 C26.2 C28.2 C30.2 D1.1 D2.1 M1.8 R10.1 R12.2 R13.2 U1.1 U1.11 U1.20 U1.30 U1.38 U1.44 U1.45 U1.49 U1.53 U1.54 U3.2 | length 69.1
  Top Layer w0.2: v1(21.5,31.25) M1.8@23.145,31.25 ; v1(24.25,19.5) 25.55,20.8 U1.11 ; v1(24.25,25.25) 24.7,24.8 U1.1 ; v1(28.25,19.75) 28.8,19.2 U1.20 ; U1.54 29.6,26.85 cw(c29.75,26.85) v1(29.75,27) 29.75,26.865 30,26.615 U1.53 ; U1.49 31.6,27.1 32.12,27.62 v1(32.12,28.75) ; v1(32.25,19.75) 32.8,19.2 U1.30 ; U1.38 35.115,22 35.365,21.75 v1(35.5,21.75) ; U1.44 35.15,24.4 v1(35.75,25) ; U1.45 34.05,24.8 v1(35.75,26.5) ; v1(39.5,37.575) 40.25,36.825 C3.2
  Top Layer w0.5: v1(18.25,41) D1.1 ; v1(20.5,41) D2.1
  Power Layer w0.2: 32,20.5 32.154,20.346 32.154,19.846 v1(32.25,19.75) 32.25,19 ; v1(35.5,21.75) 36.5,21.75
  Bottom Layer w0.2: C12.2 19.763,30.175 20.837,31.25 v1(21.5,31.25) ; R13.2 R12.2 22.05,23.75 22.95,24.75 C18.2 23.865,25 24.115,25.25 v1(24.25,25.25) ; C26.2 23.75,19 v1(24.25,19.5) ; C11.2 25.75,29 27.75,27 v1(29.75,27) ; v1(28.25,19.75) 28.25,15.425 28.5,15.175 28.5,15.15 28.725,14.925 C30.2 ; C9.1 28.75,29.25 29.25,28.75 v1(32.12,28.75) ; C28.2 v1(32.25,19.75) ; C8.2 36.325,31.175 v1(37.25,30.25) ; v1(35.5,21.75) 35.635,21.75 35.885,22 C23.2 ; v1(35.75,25) C17.2 ; v1(35.75,26.5) C15.2 ; v1(39.5,37.575) U3.2
+5V: C2.2 C6.2 F1.2 R2.2 U3.7 V1.2 V1.3 V1.4 | length 34.1
  Top Layer w0.2: F1.2@31.535,44.885 F1.2@32.089,44.331 ; R2.2 37.5,34.05 38.5,34.95 C2.2 38.75,36.825 v1(38,37.575)
  Top Layer w0.5: V1.2 31.05,43.615 31.535,44.1 31.535,44.885 V1.3 ; v1(28.438,46.155) 31.05,46.155 31.65,45.555 F1.2
  Bottom Layer w0.2: C6.2 27.02,46.155 v1(28.438,46.155) 30.593,44 34.389,44 35,43.389 35,41.75 38,38.75 v1(38,37.575) U3.7
+5V_Test_Src: D6.2 H1.1 | length 4.1
  Bottom Layer w0.5: D6.2 38.29,42.25 H1.1
+5V_VIN: D7.2 X3.17 X3.19 | length 6.8
  Bottom Layer w0.2: X3.17 31.4,39.515 31.75,39.865 v1(31.75,40) ; X3.19 v1@31.8,39.95
  Bottom Layer w0.5: v1(31.75,40) 33,40 33.75,40.75 D7.2
ALERT_PIN: R11.1 U2.20 | length 1.3
  Top Layer w0.2: U2.20 v1@9.688,26.75
  other v1: 9.75,26.825
BAT: R19.2 U2.9 U2.10 | length 19.6
  Top Layer w0.2: U2.10 6.284,19.575 v1@6.709,20 ; U2.9 6.39,20.225 6.615,20 v1@6.709,20 ; v1(6.75,20) v1@6.709,20
  Bottom Layer w0.2: R19.2 3.25,13.25 1.5,15 1.5,18.25 2,18.75 5.5,18.75 v1(6.75,20)
Batt_Mon_Alert: C14.2 R11.2 U1.4 | length 21.1
  Top Layer w0.2: v1(9.75,28.175) 9.843,28.082 10.168,28.082 15.5,22.75 23.55,22.75 23.8,22.5 24.5,22.5 25.6,23.6 U1.4
  Bottom Layer w0.2: C14.2 v1(9.75,28.175)
Batt_Mon_Reset: R1.1 U1.5 | length 30.5
  Top Layer w0.2: U1.5 26.57,23.21 27.71,23.21 v1(27.75,23.25)
  Bottom Layer w0.2: v1@6.5,36.3 9.55,33.25 22.25,33.25 24.25,31.25 24.25,28.948 27.75,25.448 v1(27.75,23.25)
  other v1: 6.5,36.175
Buzzer_Ctrl_1: U1.34 X3.8 | length 28.6
  Top Layer w0.2: U1.34 34.1,20.4 34.421,20.079 36.457,20.079 36.464,20.086 36.723,20.086 v1(36.818,20.182)
  Bottom Layer w0.2: X3.8 29.4,34.6 30.25,33.75 36.095,33.75 39.43,30.415 39.43,20.93 38.682,20.182 v1(36.818,20.182)
Buzzer_Ctrl_2: U1.32 X3.10 | length 29.2
  Top Layer w0.2: U1.32 33.45,19.59 37.41,19.59 v1(37.5,19.5)
  Bottom Layer w0.2: X3.10 29.8,34.7 30.43,34.07 36.227,34.07 39.75,30.547 39.75,20.5 38.75,19.5 v1(37.5,19.5)
Cell0: R14.1 X2.5 | length 15.7
  Bottom Layer w0.3: R14.1 23.75,17.25 29.6,11.4 31.68,11.4 X2.5
Cell1: R15.1 X2.4 | length 12.6
  Bottom Layer w0.3: R15.1 24.25,15.75 31.77,8.23 32.31,8.23 X2.4
Cell2: R17.1 X2.3 | length 9.7
  Bottom Layer w0.3: R17.1 24.25,14.25 29.77,8.73 29.77,8.23 X2.3
Cell3: R20.1 X2.2 | length 7.3
  Bottom Layer w0.3: R20.1 24.5,12.75 27.46,9.79 X2.2
Cell4: R21.1 X2.1 | length 4.7
  Bottom Layer w0.3: R21.1 24.5,11.25 24.92,10.83 X2.1
Earth: L1.1 Mount1.1 Mount2.1 Mount3.1 Mount4.1 X1.MH | length 136.6
  Top Layer w0.3: Mount3.1 4.5,5.25 Mount3.1@4.5,5.54 ; L1.1 Mount3.1@4.5,5.54 ; Mount4.1@55.5,5.54 55.5,12 51.5,16 43,16 42.25,15.25 42.25,6.5 40,4.25 20,4.25 17.5,6.75 17.5,15 16.75,15.75 7.75,15.75 6.25,14.25 6.25,7.29 Mount3.1@4.5,5.54
  Top Layer w0.4: X1.MH@51.17,20.55 56.62,20.55 56.62,22.38 56.2,22.8 X1.MH@53.75,22.8 ; X1.MH@51.17,29.45 56.62,29.45 56.62,27.62 56.2,27.2 X1.MH@53.75,27.2
  Power Layer w0.4: 0.75,4.5 Mount3.1 ; 1,45.5 Mount1.1 ; X1.MH@53.75,22.8 58.45,22.8 58.55,22.7 ; X1.MH@53.75,27.2 58.45,27.2 58.5,27.25 ; Mount4.1 59.25,4.5 ; Mount2.1 59,45.5
GND: C1.1 C2.1 C3.1 C4.1 C5.1 C6.1 C7.1 C8.1 C9.2 C10.2 C11.1 C12.1 C13.2 C14.1 C15.1 C16.1 C17.1 C18.1 C19.1 C21.1 C22.1 C23.1 C24.1 C26.1 C28.1 C29.1 C30.1 D1.2 D3.2 D4.2 D5.2 D8.2 H1.2 L1.2 M1.4 R9.1 RT1.1 S2.2 U1.47 U1.61 U2.3 U3.1 V1.1 V1.9 X1.5 X3.1 X3.2 Y1.2 Y1.4 | length 66.2
  Top Layer w0.2: M1.4@16.51,27.595 18.155,27.595 v1@18.25,27.5 ; D3.2@19.35,11.1 D4.2@21.35,11.1 ; v1(21.25,9.75) 21.25,11 D4.2@21.35,11.1 ; D5.2@23.35,11.1 D4.2@21.35,11.1 ; U1.47 32.4,26.4 32.904,26.904 33.404,26.904 v1(33.5,27) ; C2.1 C3.1 v1(41.75,33.825)
  Top Layer w0.3: U2.3 4.83,24.125 5.204,24.5 v1(5.25,24.5) ; C4.1 26.82,13.755 26.82,12.93 27.4,12.35 Y1.2 29.05,12.9 29.95,14.1 Y1.4 30.25,14.776 v1(30.25,16.25)
  Top Layer w0.5: D1.2 v1(18.25,46.038)
  Bottom Layer w0.2: v1(7.75,24.5) C22.1 C21.1 ; C13.2 C16.1 14.325,25.925 15,25.25 v1(16,25.25) ; v1@18.25,27.5 18.71,27.96 18.71,28.46 19.075,28.825 C12.1@20,28.825 ; v1(21.5,27.5) 21.5,27.365 21.825,27.04 C18.1 ; C26.1 C24.1 ; C7.1 24.502,44.825 24.727,44.6 24.727,44.361 24.839,44.25 26.661,44.25 26.773,44.361 26.773,44.6 26.998,44.825 C6.1 ; C11.1 C10.2 ; X3.2 28.2,33.3 v1(28.25,33.25) 27.25,32.25 C10.2 ; X3.1 28.2,40.2 v1(28.25,40.25) ; C30.1 C29.1 C28.1 33.04,13.575 33.615,13 v1(33.75,13) ; C9.2 C10.2 ; v1(33.5,27) 33.5,29.1 34.225,29.825 C8.1 ; v1(38.175,28.5) C15.1 C17.1 C19.1 C23.1 C23.1@38.25,21.925 ; v1(39.5,38.5) 39.595,38.5 39.87,38.225 U3.1 ; v1(54.75,37.75) 54.75,36.575 R9.1
  other v1: 17.75,1.25 42.25,1.25 4.5,11.15 37.75,14 44.25,20.5 15.75,21.5 30,22 51.17,26.6 8.25,26.825 18.25,27.595 33.25,37.5 31.25,42.25 28.438,42.345 25.75,44.25
LED1: R5.2 U1.13 | length 10.3
  Top Layer w0.2: R5.2 19.25,17.75 20.14,18.64 24.39,18.64 25.75,20 U1.13
LED2: R6.2 U1.14 | length 7.9
  Top Layer w0.2: R6.2 21.25,17.25 22.32,18.32 24.523,18.32 25.803,19.6 U1.14
LED3: R7.2 U1.15 | length 5.8
  Top Layer w0.2: R7.2 23.25,17.5 23.75,18 24.75,18 25.95,19.2 U1.15
Neopixel_Data: U1.31 X3.14 | length 29.8
  Top Layer w0.2: U1.31 35.05,19.2 v1(35.5,18.75)
  Bottom Layer w0.2: X3.14 30.6,34.9 31.11,34.39 36.36,34.39 40.14,30.61 40.14,20.14 38.75,18.75 v1(35.5,18.75)
NetC5_2: C5.2 R8.1 Y1.3 | length 3.6
  Top Layer w0.2: Y1.3 32.075,12.35 C5.2 R8.1
NetC7_2: C7.2 D2.2 V1.5 V1.6 V1.7 | length 11.1
  Top Layer w0.5: 20.5,45.084 20.699,44.885 V1.6 ; V1.7 21.389,43.615 20.5,44.504 20.5,46.005 20.65,46.155 v1(23.062,46.155)
  Bottom Layer w0.2: v1(23.062,46.155) 24.48,46.155 C7.2
NetC22_2: C22.2 U2.7 | length 4.2
  Top Layer w0.2: U2.7 4.775,21.525 v1(5.25,22)
  Bottom Layer w0.2: v1(5.25,22) 7.575,22 C22.2
NetD3_1: D3.1 R5.1 | length 1.4
  Top Layer w0.2: D3.1 R5.1
NetD4_1: D4.1 R6.1 | length 1.4
  Top Layer w0.2: D4.1 R6.1
NetD5_1: D5.1 R7.1 | length 1.4
  Top Layer w0.2: D5.1 R7.1
NetD6_1: D6.1 D7.1 D8.1 F1.1 | length 6.4
  Bottom Layer w0.5: D8.1 D7.1 D6.1 36.25,44.9 v1(35.85,44.5)
NetD9_1: D9.1 R16.1 R19.1 | length 4.2
  Bottom Layer w0.2: D9.1 5,15 5.225,14.75 6.125,13.5 R19.1
NetR2_1: R2.1 U3.8 | length 5.4
  Top Layer w0.2: v1(35.25,38.225) 37.25,36.225 R2.1
  Bottom Layer w0.2: v1(35.25,38.225) U3.8
NetR9_2: R9.2 S1.2 | length 10.4
  Bottom Layer w0.2: R9.2 56.175,38.175 57.75,39.75 S1.2@57.75,33.25
ORing_EN: U1.35 X3.4 | length 27.9
  Top Layer w0.2: U1.35 33.45,20.79 35.46,20.79 v1(35.5,20.75)
  Bottom Layer w0.2: X3.4 28.6,34.65 29.82,33.43 35.962,33.43 39,30.392 39,21.25 38.5,20.75 v1(35.5,20.75)
QSPI_SCLK: M1.6 U1.56 | length 8.5
  Top Layer w0.2: M1.6 23.415,28.75 28.25,28.75 28.8,28.2 U1.56
QSPI_SD0: M1.5 U1.57 | length 7
  Top Layer w0.2: M1.5 27.905,27.595 28.4,27.1 U1.57
QSPI_SD1: M1.2 U1.59 | length 18.8
  Top Layer w0.2: M1.2 14.885,30.135 14.43,29.68 14.43,27.07 15.07,26.43 27.305,26.43 27.6,26.135 U1.59
QSPI_SD2: M1.3 U1.58 | length 17.3
  Top Layer w0.2: M1.3 15.115,28.865 14.75,28.5 14.75,27.25 15.25,26.75 27.5,26.75 28,26.25 U1.58
QSPI_SD3: M1.7 U1.55 | length 10.1
  Top Layer w0.2: M1.7 28.44,30.135 29.2,29.375 U1.55
QSPI_SS: M1.1 R18.1 U1.60 | length 76
  Top Layer w0.2: v1(16.2,31.405) 14.655,31.405 14.11,30.86 14.11,26.937 14.937,26.11 27.089,26.11 27.2,25.999 U1.60
  Bottom Layer w0.2: v1(16.2,31.405) 17.295,32.5 22,32.5 23.5,31 23.5,27.5 26.5,24.5 26.5,22.793 28.293,21 32.75,21 33.75,20 33.75,18.75 35,17.5 49,17.5 50.5,19 54.75,19 55.95,17.8 55.95,13.725 R18.1
REGOUT: C21.2 U1.41 U2.8 | length 74.2
  Top Layer w0.2: U2.8 3.875,20.938 5.938,20.938 v1(6,21) 7,21 8,20 8,17.25 9,16.25 17.25,16.25 18,15.5 18,7.25 19.75,5.5 36.75,5.5 40,8.75 v1(40,11.25) ; U1.41 34.7,23.2 35.25,23.75 37.25,23.75 40,21 v1(40,13.5)
  Bottom Layer w0.2: v1(6,21) 8.4,21 9.225,21.825 C21.2 ; v1(40,11.25) v1(40,13.5)
RP2350_D_N: R4.1 X1.2 | length 3.5
  Top Layer w0.23: R4.1 cw(c48.846,23.75) 48.846,24.421 50.949,24.421 cw(c50.949,24.2) X1.2
RP2350_D_P: R3.1 X1.3 | length 3.4
  Top Layer w0.23: R3.1 ccw(c48.646,25.25) 48.646,24.779 50.949,24.779 ccw(c50.949,25) X1.3
RP2350_DX_N: R4.2 U1.51 | length 28.3
  Top Layer w0.23: U1.51 cw(c30.8,25.461) 30.779,25.461 30.779,30.529 cw(c32,30.529) 32,31.75 43,31.75 cw(c43,30.5) 44.25,30.5 44.25,26.143 ccw(c46,26.143) 46,24.393 46.182,24.393 cw(c46.182,23.75) R4.2
RP2350_DX_P: R3.2 U1.52 | length 28.8
  Top Layer w0.23: U1.52 ccw(c30.4,25.461) 30.421,25.461 30.421,30.529 cw(c32,30.529) 32,32.107 43,32.107 cw(c43,30.5) 44.607,30.5 44.607,26.143 ccw(c46,26.143) 46,24.75 46.325,24.75 ccw(c46.325,25.25) R3.2
RUN: S1.1 U1.26 | length 60.5
  Top Layer w0.2: U1.26 31.2,17.05 32.5,15.75 33.25,15.75 36.75,12.25 40.508,12.25 41.25,12.992 41.25,16.25 43.25,18.25 57.5,18.25 59,19.75 59,30.5 58.25,31.25 55.25,31.25 53.25,33.25 S1.1@53.25,39.75
SCL0: R13.1 U1.3 U2.5 U3.3 | length 75
  Top Layer w0.2: U2.5 5.825,22.825 7,24 v1(7,27) ; U1.3 25,24 v1(24.25,23.25) 16,23.25 12,27.25 v1(12,29.5) 12,32.25 13.75,34 23.75,34 30.5,40.75 39.75,40.75 42.77,37.73 42.77,37.02 v1(42.75,37)
  Bottom Layer w0.2: v1(7,27) 7,28.25 8,29.25 11.639,29.25 11.889,29.5 v1(12,29.5) ; R13.1 23.175,22.025 24.154,23.004 24.154,23.154 v1(24.25,23.25) ; U3.3 40.738,36.962 42.713,36.962 v1(42.75,37)
SCL_5V: U3.6 X3.18 | length 6.4
  Bottom Layer w0.2: X3.18 31.4,36.15 32.175,36.925 U3.6
SDA0: R12.1 U1.2 U2.4 U3.4 | length 71.9
  Top Layer w0.2: U2.4 3.825,23.488 5.487,23.488 6,24 v1(6,27) ; U1.2 24.535,24.4 24.385,24.25 15.75,24.25 13,27 v1(13,30.75) 13,32.5 14,33.5 24.25,33.5 30,39.25 40.5,39.25 42.115,37.635 v1(42.115,36)
  Bottom Layer w0.2: v1(6,27) 6,28 7.75,29.75 11,29.75 12,30.75 v1(13,30.75) ; R12.1 23.175,23.525 23.804,24.154 24.154,24.154 v1(24.25,24.25) ; U3.4 41.84,36.275 v1(42.115,36)
SDA_5V: U3.5 X3.20 | length 5.7
  Bottom Layer w0.2: X3.20 31.8,36.05 32.025,36.275 U3.5
TS1: C1.2 R1.2 RT1.2 U2.6 | length 16.7
  Top Layer w0.3: U2.6 2.575,22.175 2.25,22.5 2.25,29 RT1.2 4.25,33 5,33.75 C1.2 R1.2
U\S\B\_\B\O\O\T\: R18.2 S2.1 | length 10.4
  Bottom Layer w0.2: S2.1@53.25,10.25 53.25,16.75 54.75,15.25 54.75,13.575 R18.2
VC0: C13.1 R14.2 U2.17 | length 23.9
  Top Layer w0.3: U2.17 10.975,23.475 11.25,23.75 v1(11.25,25.5)
  Bottom Layer w0.3: v1(11.25,25.5) 11.25,26.75 13.175,28.675 14.825,28.675 19.25,24.25 19.25,19 21,17.25 R14.2
VC1: C16.2 C20.1 R15.2 U2.16 | length 19.7
  Top Layer w0.3: U2.16 11.325,22.825 v1(12,23.5)
  Bottom Layer w0.3: v1(12,23.5) 13.075,24.575 C16.2 C20.1 17.075,23.175 18.5,21.75 18.5,17.75 20.5,15.75 R15.2
VC2: C20.2 C25.1 R17.2 U2.15 | length 17.6
  Top Layer w0.3: U2.15 9.725,22.213 11.962,22.213 v1(12,22.25)
  Bottom Layer w0.3: v1(12,22.25) 12.108,22.25 12.533,21.825 C20.2 C25.1 16.575,20.425 17.75,19.25 17.75,17 20.5,14.25 R17.2
VC3/4: C25.2 C27.1 R20.2 U2.13 U2.14 | length 19.2
  Top Layer w0.3: U2.13 9.751,20.938 11.937,20.938 v1(12,21) 12,21.136 11.952,21.185 11.952,21.336 11.762,21.525 U2.14
  Bottom Layer w0.3: v1(12,21) 12.077,20.923 12.077,20.723 13.725,19.075 C25.2 C27.1 16.075,17.675 21,12.75 R20.2
VC5: C27.2 D9.2 R16.2 R21.2 U2.12 | length 24.2
  Top Layer w0.3: U2.12 11.275,20.225 11.5,20 v1(11.5,17)
  Bottom Layer w0.2: R16.2 6.35,16.1 7.25,17 D9.2 v1(11.5,17)
  Bottom Layer w0.3: v1(11.5,17) 12.175,16.325 16.175,16.325 21.25,11.25 R21.2
VREG_AVDD: R10.2 U1.46 | length 6.2
  Top Layer w0.2: U1.46 32.8,26.05 33.125,26.375 34.125,26.375 34.25,26.5 v1(34.25,27.75)
  Bottom Layer w0.2: v1(34.25,27.75) 34.305,27.805 34.305,28.38 35.5,29.575 35.5,29.6 35.725,29.825 R10.2
VREG_LX: L2.2 U1.48 | length 6.4
  Top Layer w0.2: U1.48 32,26.75 32.654,27.404 32.654,27.654 v1(32.75,27.75)
  Bottom Layer w0.2: L2.2 32,30 32.67,29.33 32.67,27.83 v1(32.75,27.75)
XIN: C4.2 U1.21 Y1.1 | length 6.1
  Top Layer w0.2: C4.2 26.775,15.175 27,14.95 27,14.925 27.175,14.75 28.526,14.75 Y1.1 ; Y1.1@28.625,14.775 29.2,15.35 U1.21
XOUT: R8.2 U1.22 | length 4.5
  Top Layer w0.2: U1.22 29.6,17.825 32,15.425 32,15.4 32.225,15.175 R8.2
pads on no net: U1.7 U1.8 U1.9 U1.10 U1.12 U1.16 U1.17 U1.18 U1.19 U1.24 U1.25 U1.27 U1.28 U1.29 U1.33 U1.36 U1.37 U1.40 U1.42 U1.43 U2.1 U2.2 U2.11 U2.18 U2.19 V1.8 X1.1 X1.4 X3.3 X3.5 X3.6 X3.7 X3.9 X3.11 X3.12 X3.13 X3.15 X3.16

## Polygon pours and split planes (outlines as drawn)
+3V3 on Power Layer "+3V3 Poly" (solid, remove dead copper, pour order 14): 0,0 0,50 60,50 60,0
Earth on Power Layer "Earth Poly 2" (solid, remove dead copper, pour order 13): 60,50 58,50 58,0 60,0
Earth on Power Layer "Earth Poly 1" (solid, remove dead copper, pour order 12): 0,50 2,50 2,0 0,0
+1V1 on Power Layer "+1V1 Poly" (solid, remove dead copper, pour order 11): 25.75,26.25 34.25,26.25 34.25,17.75 33,17.75 33,25 27,25 27,17.75 25.75,17.75
GND on Ground Layer "GND Poly" (solid, remove dead copper, pour order 10): 0,0 0,50 60,50 60,0
GND on Top Layer "GND Top Poly" (hatched 45Degree grid 0.508 track 0.203, remove dead copper, pour order 9): 0,0 60,0 60,50 0,50
GND on Bottom Layer "GND Bottom Poly" (hatched 45Degree grid 0.508 track 0.203, remove dead copper, pour order 15): 0,0 60,0 60,50 0,50

## Keep-outs
Keep-Out Layer:
  the board outline again, w0.2

## Other copper
Ground Layer:
  pour cut-out: 2.75,26 2.75,19 10.75,19 10.75,26

## Silkscreen, mask and mechanical layers (free items; w line width, h text height)
Top Overlay:
  drawing of 13 lines, arcs and shapes, not listed
  text "VTest" at 37.584,48.25 h1
  text "-" at 41.834,45.75 h1
  text "+" at 41.834,43.21 h1
  text "+5V" at 38.417,40.8 h1
  text "Sub Batt / Control" at 17,36.13 h1.2
  text "V3" at 21.167,34 h1
  text "OUT-" at 43.667,33.5 h1
  text "OUT+" at 10.667,33.25 h1
  text "RUN" at 48.584,32.75 h1
  text "BOOT" at 47.585,16.25 h1
  text "IN+" at 17.25,2.75 h1
  text "IN-" at 40.251,2.75 h1
Bottom Overlay:
  region: 44.5,33.29 44.5,33.75 45,33.75 45,33.25 44.5,33.25 44.5,33.289
  region: 50,33.376 50,33.25 49.5,33.25 49.5,33.75 50,33.75 50,33.377
  region: 47.963,30.75 47.5,30.75 47.5,31.25 48,31.25 48,30.75 47.964,30.75
  region: 46.549,31.25 47,31.25 47,30.75 46.5,30.75 46.5,31.25 46.548,31.25
  region: 45,31.935 45,32.25 45.5,32.25 45.5,32.75 45,32.75 45,33.25 46,33.25 46,32.25 46.5,32.25 46.5,33.25 46,33.25 46,34.25 46.5,34.25 46.5,33.75 48,33.75 48,34.25 48.5,34.25 48.5,33.25 48,33.25 48,32.25 48.5,32.25 48.5,33.25 49.5,33.25 49.5,32.75 49,32.75 49,32.25 49.5,32.25 49.5,31.75 50,31.75 50,30.75 49.5,30.75 49.5,31.25 49,31.25 49,31.75 48.5,31.75 48.5,31.25 48,31.25 48,31.75 46.5,31.75 46.5,31.25 46,31.25 46,31.75 45.5,31.75 45.5,31.25 45,31.25 45,30.75 44.5,30.75 44.5,31.75 45,31.75 45,31.934
  lines w0.254: 3.992,40.75 4.5,41.258 4.5,39.558 ; 4.492,41.258 5,40.75 ; 41.75,19.758 42.258,19.25 ; 42.258,20.258 41.75,19.75 49,19.75 49,27 49.508,26.492 ; 48.5,26.492 49.008,27
  text "M3" at 5.5,37.65 h1.2
  text "Board" at 48.25,22.3 h1.2
  text "Dim" at 48.25,20.5 h1.2
  text "25mm" at 49.75,20.076 h1.2 r270
  text "60mm" at 47.574,18.05 h1.2
Poly Planning:
  lines w0.1: 0,0 0,50 2,50 2,0 0,0 ; 25.75,17.75 27,17.75 27,25 33,25 33,17.75 34.25,17.75 34.25,26.25 25.75,26.25 25.75,17.75 ; 58,0 60,0 60,50 58,50 58,0